# Altium PCB eZlo_Radar.PcbDoc
Units mil, origin at the board's own origin, x right, y up, seen from the top; angles counter-clockwise.
Board outline 1338.58 x 452.76 mil, 4 copper layers (Top Layer, Power, GND, Bottom Layer), stack 64.008 mil thick; 29 components, 19 nets, 114 pads, 52 vias.
Unrouted connection lines stored in the file: 7.
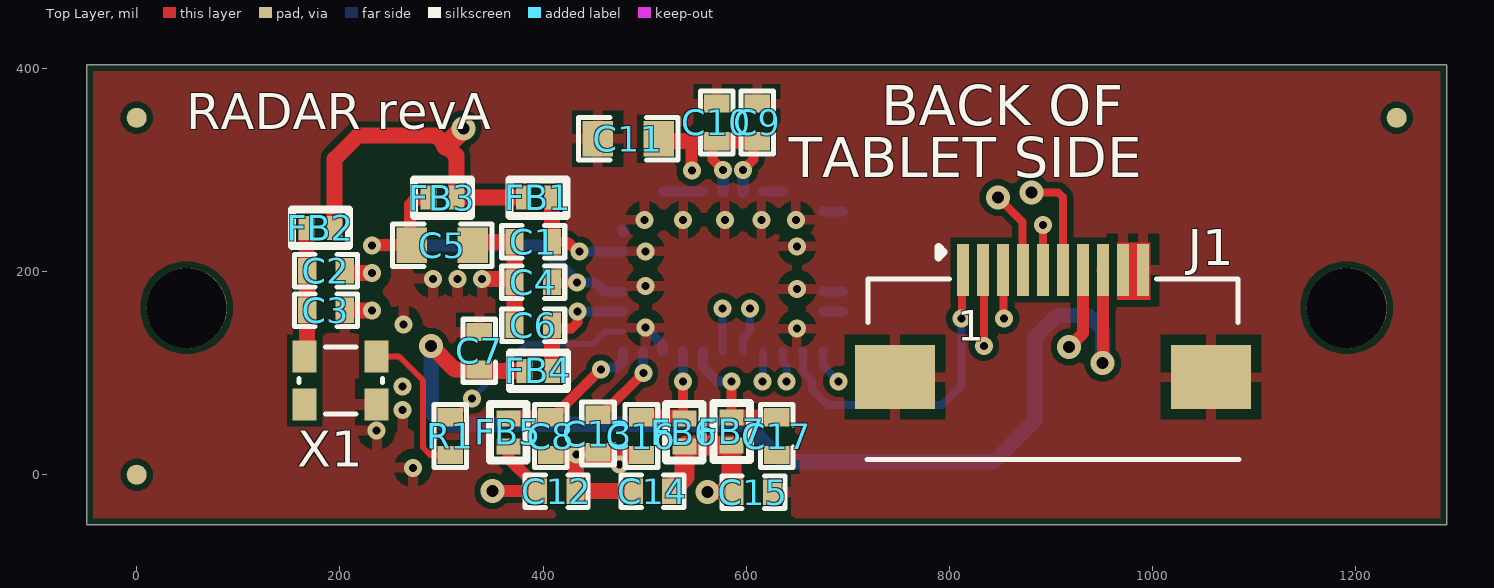
[diagram p0: Top Layer view]
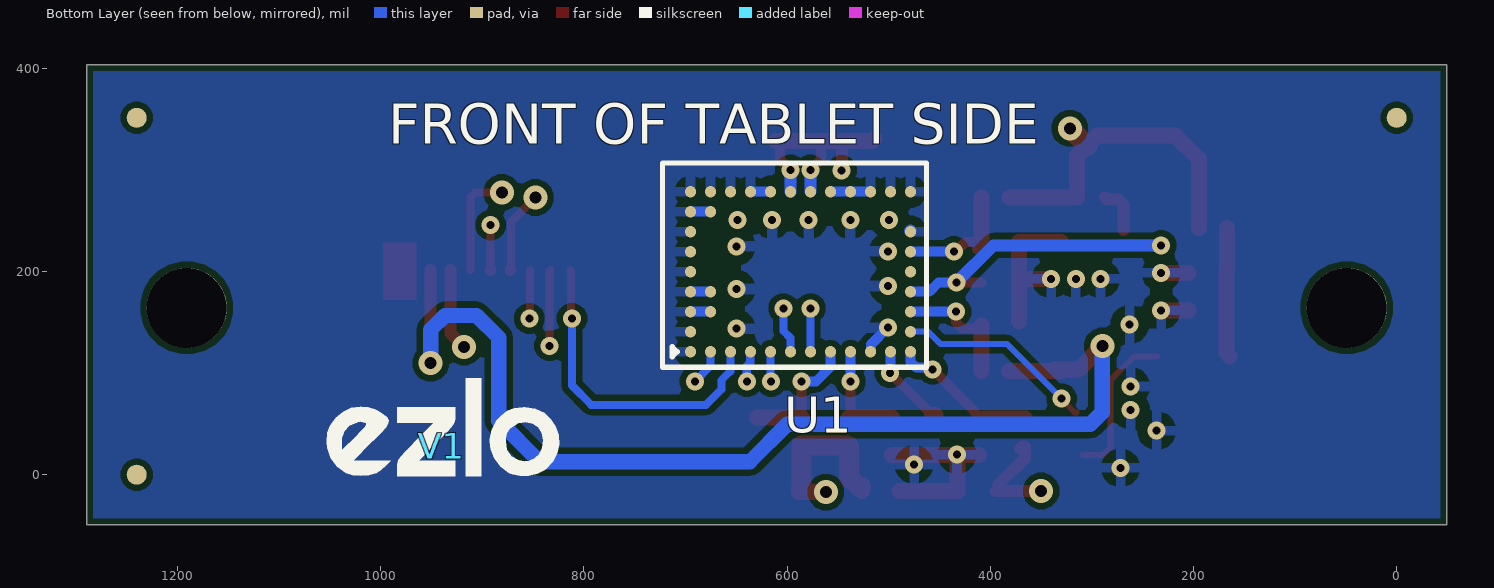
[diagram p1: Bottom Layer view, seen from below]
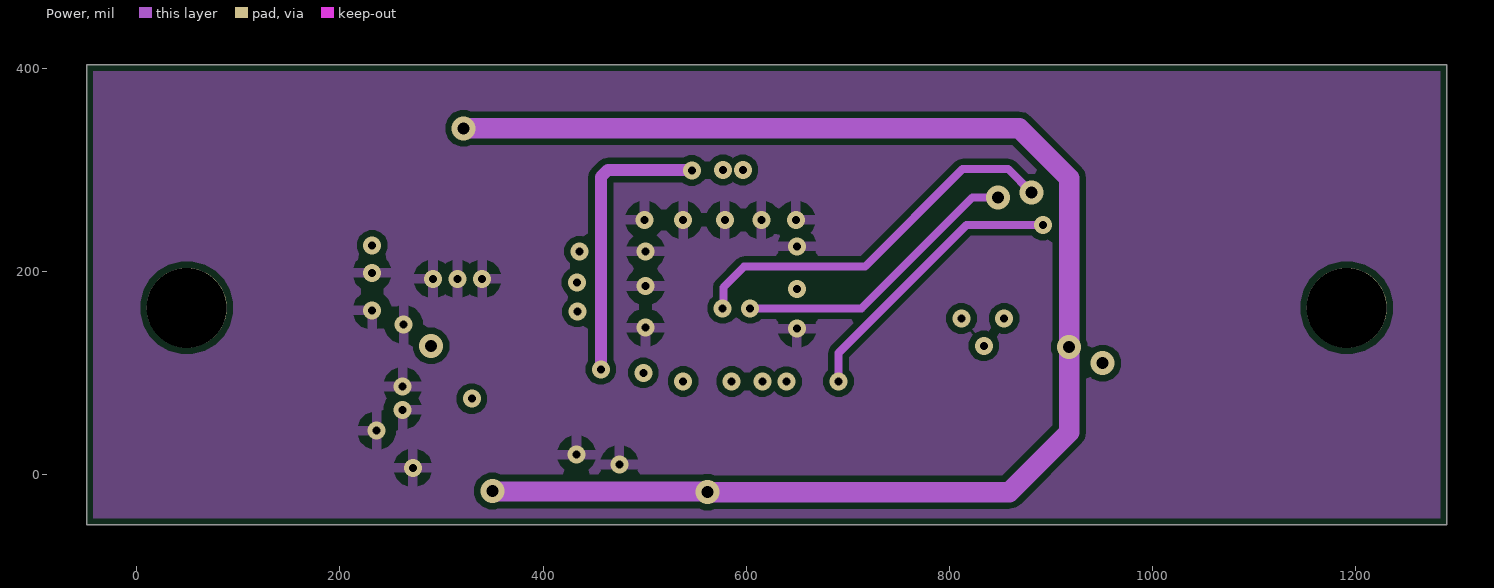
[diagram p2: Power]
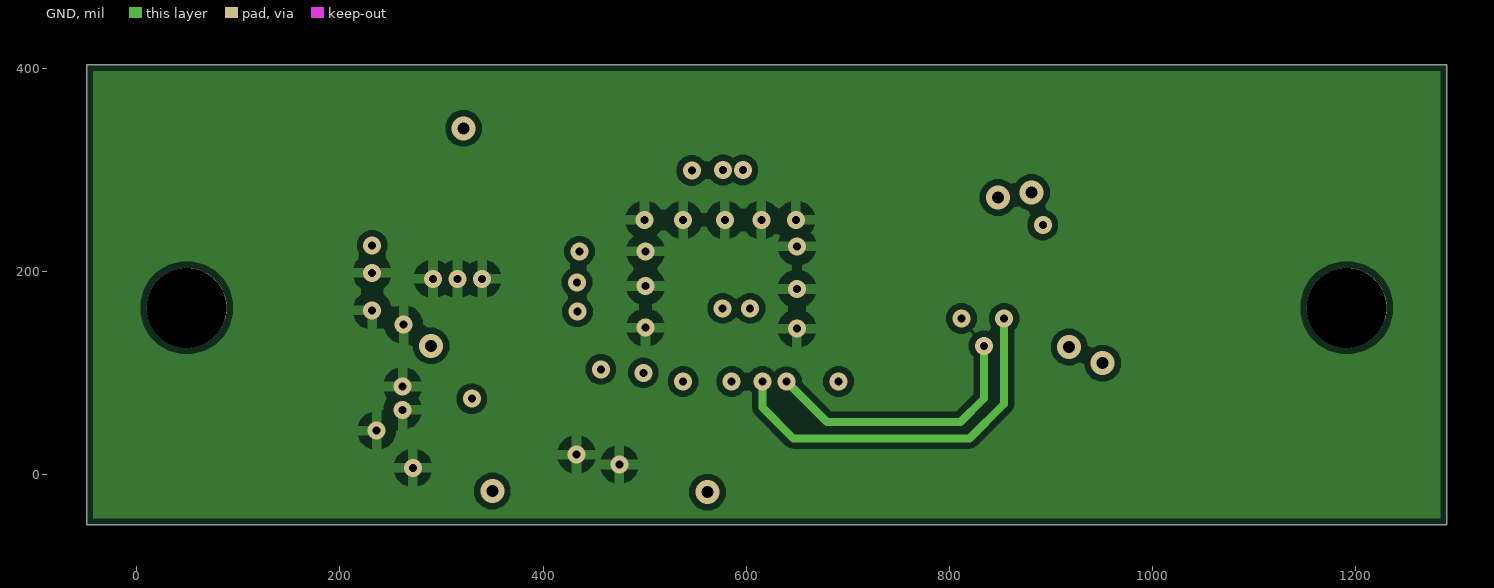
[diagram p3: GND]
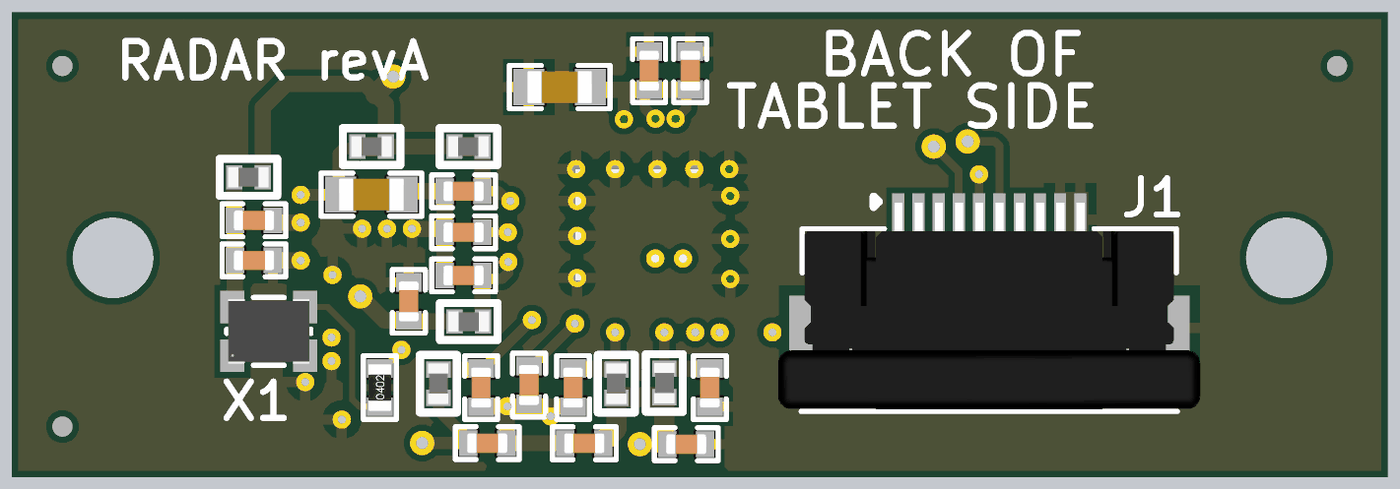
[diagram p4: 3D render of the assembled board from above, using the file's embedded part models]

## Layer stack, top to bottom
Top Solder: solder mask 0.3937, Solder Resist, Dk 3.5
Top Layer: signal copper 1.378
Dielectric 2: prepreg 8.2835, PP-006, Dk 4.1
Power: signal copper 1.378
Dielectric 1: core 41.9291, FR-4, Dk 4.8
GND: signal copper 1.378
Dielectric 3: prepreg 8.2835, PP-006, Dk 4.1
Bottom Layer: signal copper 1.378
Bottom Solder: solder mask 0.3937, Solder Resist, Dk 3.5

## Board outline
-49.21,-49.21 -49.21,403.54 1289.37,403.54 1289.37,-49.21

## Design rules (kind name [scope] priority, off if disabled: settings)
Clearance [All] p1: gap=6 ignorepadtopadclearanceinfootprint=FALSE except(4: Arc-SMDPad Track-SMDPad SMDPad-SMDPad)
ComponentClearance [All] p1: gap=0 collisioncheckmode=3 verticalgap=0 showdistances=FALSE
HoleSize [All] p1: absolutevalues=TRUE maxlimit=1000 minlimit=1 maxpercent=80.000 minpercent=20.000
HoleToHoleClearance [All] p1: gap=0 allowstackedmicrovias=TRUE
MinimumSolderMaskSliver [All] p1: minsoldermaskwidth=0
PlaneConnect [All] p1: planeconnectstyle=Direct reliefexpansion=20 reliefentries=4 reliefconductorwidth=10 reliefairgap=10
PolygonConnect [All] p1: connectstyle=Relief reliefconductorwidth=10 reliefentries=4 polygonreliefangle="90 Angle" airgapwidth=10
RoutingVias [All] p1: holewidth=11.81 width=23.62 viastyle="Through Hole" minholewidth=7.87 minwidth=17.72 maxholewidth=11.81 maxwidth=23.62
SilkToSilkClearance [All] p1: silktosilkclearance=0
SilkToSolderMaskClearance [IsPad] p1: minsilkscreentomaskgap=0 clearancetoexposedcopper=TRUE
SolderMaskExpansion [All] p1: expansion=0 istentingtop=FALSE soldermaskfromhole=TRUE
Width [All] p1: maxlimit=20 minlimit=3.94 preferedwidth=15.75 minimp=50.000000 maximp=50.000000 favimp=50.000000
23 further rules are at their usual default settings.

## Components (designator, comment, footprint, x,y, rotation, side; value= is the part's Value field where it differs from the comment)
C1 "1uF" Cap-0402 390.29,229.29 r180 top
C2 "1uF" Cap-0402 186.28,200.94 r180 top
C3 "10nF" Cap-0402 186.28,161.94 r180 top
C4 "1uF" Cap-0402 390.29,189.29 r180 top
C5 "22uF" Cap-0603 300.61,225.94 r0 top
C6 "1uF" Cap-0402 390.29,147.29 r180 top
C7 "10uF" Cap-0402 337,122 r90 top
C8 "1uF" Cap-0402 407.38,38 r270 top
C9 "1uF" Cap-0402 610.79,346.79 r90 top
C10 "1uF" Cap-0402 570.79,346.79 r90 top
C11 "22uF" Cap-0603 483.79,330.79 r180 top
C12 "10uF" Cap-0402 413.35,-16.14 r0 top
C13 "0.47uF" Cap-0402 454,40.5 r270 top
C14 "10uF" Cap-0402 507.72,-16.27 r180 top
C15 "10uF" Cap-0402 606.94,-17.17 r0 top
C16 "0.1uF" Cap-0402 496.79,38 r270 top
C17 "1uF" Cap-0402 629.89,38 r270 top
FB1 "100MHz" IND-0402 395.01,272.79 r180 top
FB2 "100MHz" IND-0402 180.98,242.91 r180 top
FB3 "100MHz" IND-0402 300.79,272.79 r0 top
FB4 "100MHz" IND-0402 395.29,102.29 r180 top
FB5 "100MHz" IND-0402 365.79,41.79 r270 top
FB6 "100MHz" IND-0402 538.92,41.79 r270 top
FB7 "100MHz" IND-0402 585.62,42.44 r270 top
J1 "AFC01-S10FCC-00" AFC01-S10FCC-00 901.79,148.79 r0 top locked
R1 "150R" Res-0402 308.79,38 r90 top
U1 "BGT60TR13CE6327XUMA1" pg-vf2bga-40 586.79,199.79 r180 bottom locked
V1 "EZLO_LOGO" "Logo Ezlo_S" 940,28 r0 bottom
X1 "80MHz" KC2016K 200.79,92.79 r0 top

## Footprints (in the part's own frame and the unit in brackets; to place one, negate y for a bottom-side part, rotate by r counter-clockwise, add the part's x,y. Pads: shape width x height; smd on the part's side, far side on the other; paste and mask are expansions set on the pad)
AFC01-S10FCC-00 [mm]
  rect 0.3x1.3 smd: 1(-2.25,1.34) 2(-1.75,1.34) 3(-1.25,1.34) 4(-0.75,1.34) 5(-0.25,1.34) 6(0.25,1.34) 7(0.75,1.34) 8(1.25,1.34) 9(1.75,1.34) 10(2.25,1.34)
  rect 2x1.6 smd: MP1(-3.95,-1.34) MP2(3.95,-1.34)
  silkscreen extent -4.65,-3.4 4.65,1.91, body extent -5.22,-3.35 5.22,1.76, height 2.05
Cap-0402 [mil]
  rect 18x25 smd mask+2.36: 1(-18.5,0) 2(18.5,0)
  silkscreen extent -31,-16 31,16, body extent -20,-10 20,10, height 19
Cap-0603 [mil]
  rect 30x35 smd mask+2.36: 1(-30,0) 2(30,0)
  silkscreen extent -49,-21 49,21, body extent -32,-16 31,16, height 34
IND-0402 [mm]
  rect 0.4x0.6 smd: 1(-0.35,0) 2(0.35,0)
  silkscreen extent -0.71,-0.46 0.71,0.46, body extent -0.5,-0.25 0.5,0.25, height 0.25
KC2016K [mm]
  rect 0.6x0.8 smd: 1(-0.9,-0.6) 2(0.9,-0.6) 3(0.9,0.6) 4(-0.9,0.6)
  silkscreen extent -1.04,-0.84 1.04,0.84, body extent -1,-0.8 1,0.8, height 0.81
"Logo Ezlo_S" [mil]
  silkscreen extent -116,-67 113,29
pg-vf2bga-40 [mm]
  round 0.285 smd: A1(-2.75,-2) A2(-2.75,-1.5) A3(-2.75,-1) A4(-2.75,-0.5) A5(-2.75,0) A6(-2.75,0.5) A7(-2.75,1) A8(-2.75,1.5) A9(-2.75,2) B1(-2.25,-2) B3(-2.25,-1) B4(-2.25,-0.5) B8(-2.25,1.5) B9(-2.25,2) C1(-1.75,-2) C9(-1.75,2) D1(-1.25,-2) D9(-1.25,2) E1(-0.75,-2) E9(-0.75,2) F1(-0.25,-2) F9(-0.25,2) G1(0.25,-2) G9(0.25,2) H1(0.75,-2) H9(0.75,2) J1(1.25,-2) J9(1.25,2) K1(1.75,-2) K9(1.75,2) L1(2.25,-2) L9(2.25,2) M1(2.75,-2) M2(2.75,-1.5) M3(2.75,-1) M4(2.75,-0.5) M5(2.75,0) M6(2.75,0.5) M7(2.75,1) M9(2.75,2)
  silkscreen extent -3.45,-2.39 3.15,2.72, body extent -3.4,-2.32 3.1,2.68, height 0.9
Res-0402 [mil]
  rect 18x25 smd mask+2.17: 1(-18.5,0) 2(18.5,0)
  silkscreen extent -32,-17 32,16, body extent -23,-11 23,11, height 16

## Part data
C1 C2 C4 C6 C8 C9 C10 C17: library part CC0402KRX5R6BB105, "CAP CER 1UF 10V X5R 0402", Case Code (Imperial)=0402, Case Code (Metric)=1005, Dielectric=X5R, LCSC Part Number=C106254, Manufacturer=Yageo, Max Operating Temperature=85°C, Min Operating Temperature=-55°C, Package Quantity=1, Resistor Type=Ceramic, Supplier Part Number 1=603-CC402KRX5R6BB105, Tolerance=10%, Voltage Rating=10V, Capacitance=1uF, Case/Package=0402, Category="Ceramic Capacitors", ComponentLink1Description=https://datasheet.ciiva.com/176/upy-gphc-x5r-4v-to-50v-12-176704.pdf?src-supplier=Digi-Key, ComponentLink1URL=https://datasheet.ciiva.com/176/upy-gphc-x5r-4v-to-50v-12-176704.pdf?src-supplier=Digi-Key, ComponentLink2Description=https://datasheet.ciiva.com/176/mlccorderingcode-176705.pdf?src-supplier=Digi-Key, ComponentLink2URL=https://datasheet.ciiva.com/176/mlccorderingcode-176705.pdf?src-supplier=Digi-Key, ComponentLink3Description=https://datasheet.ciiva.com/176/mlccorderingcode-176706.pdf?src-supplier=Digi-Key, ComponentLink3URL=https://datasheet.ciiva.com/176/mlccorderingcode-176706.pdf?src-supplier=Digi-Key, Construction=Flat, Depth=0.5mm, Dissipation Factor=15%, Halogen Free="Halogen Free", Height=0.5mm, Lead Free="Lead Free", Length=1mm, Manufacturer Part Number=CC0402KRX5R6BB105, Mount="Surface Mount", Number of Pins=2, Packaging="Tape and Reel", Pricing 1="1=0.11000, 10=0.05500, 50=0.05500, 100=0.03300, 500=0.02700, 1000=0.02200, 2500=0.02100, 10000=0.01800 (USD)", Radiation Hardening=No, REACH SVHC="No SVHC", RoHS=Yes, RoHS Compliant=Yes, Series=CC, Stock 1=6711367, Supplier 1=Mouser, Termination=SMD/SMT, Thickness=0.022inch, Voltage Rating (DC)=10V, Width=0.02inch
C3: library part CC0402KRX7R8BB103, "CAP CER 10000PF 25V X7R 0402", Case Code (Imperial)=0402, Case Code (Metric)=1005, Dielectric=X7R, LCSC Part Number=C327025, Manufacturer=Yageo, Max Operating Temperature=125°C, Min Operating Temperature=-55°C, Package Quantity=1, Supplier Part Number 1=311-1337-1-ND, Tolerance=10%, Voltage Rating=25V, Capacitance=10nF, Case/Package=0402, ComponentLink1Description=http://www.yageo.com/documents/recent/UPY-GPHC_X7R_6.3V-to-50V_18.pdf?src-supplier=Digi-Key, ComponentLink1URL=http://www.yageo.com/documents/recent/UPY-GPHC_X7R_6.3V-to-50V_18.pdf?src-supplier=Digi-Key, ComponentLink2Description=https://www.verical.com/server-webapp/html/getDatasheet?partID=375418&src-supplier=Verical, ComponentLink2URL=https://www.verical.com/server-webapp/html/getDatasheet?partID=375418&src-supplier=Verical, ComponentLink3Description=http://www.yageo.com/documents/recent/UPY-GPHC_X7R_6.3V-to-50V_8.pdf?src-supplier=Avnet, ComponentLink3URL=http://www.yageo.com/documents/recent/UPY-GPHC_X7R_6.3V-to-50V_8.pdf?src-supplier=Avnet, ComponentLink4Description=https://4donline.ihs.com/images/VipMasterIC/IC/YAGO/YAGO-S-A0003557223/YAGO-S-A0003557223-1.pdf?hkey=52A5661711E402568146F3353EA87419&src-supplier=Element14, ComponentLink4URL=https://4donline.ihs.com/images/VipMasterIC/IC/YAGO/YAGO-S-A0003557223/YAGO-S-A0003557223-1.pdf?hkey=52A5661711E402568146F3353EA87419&src-supplier=Element14, ComponentLink5Description=http://www.farnell.com/datasheets/2167236.pdf?src-supplier=Element14, ComponentLink5URL=http://www.farnell.com/datasheets/2167236.pdf?src-supplier=Element14, ComponentLink6Description=http://www.mouser.com/ds/2/447/Yageo_UPY-GP_NP0_16V-to-50V_9-358835.pdf?src-supplier=Mouser, ComponentLink6URL=http://www.mouser.com/ds/2/447/Yageo_UPY-GP_NP0_16V-to-50V_9-358835.pdf?src-supplier=Mouser, Composition=Ceramic, Depth=0.5mm, Halogen Free="Halogen Free", Height=0.5mm, Lead Free="Lead Free", Length=1mm, Manufacturer Part Number=CC0402KRX7R8BB103, Mount="Surface Mount", Packaging="Tape and Reel", Pricing 1="1=0.1, 10=0.021, 100=0.0093, 500=0.00666, 1000=0.00523, 2500=0.00476, 5000=0.00438 (USD)", Radiation Hardening=No, REACH SVHC=Unknown, Stock 1=0, Supplier 1=Digi-Key, Termination=SMD/SMT, Thickness=0.022inch, Voltage Rating (DC)=25V, Width=0.02inch
C5 C11: library part CC0603MRX5R6BB226, "CAP CER 22UF 10V X5R 0603", Case Code (Imperial)=0603, Case Code (Metric)=1608, Dielectric=X5R, LCSC Part Number=C109447, Manufacturer=Yageo, Max Operating Temperature=85°C, Min Operating Temperature=-55°C, Package Quantity=4000, Supplier Part Number 1=311-1819-1-ND, Tolerance=20%, Voltage Rating=10V, Capacitance=22uF, Case/Package=0603, Category="Ceramic Capacitors", ComponentLink1Description=http://www.mouser.com/ds/2/447/Yageo_UPY-GP_NP0_16V-to-50V_9-358835.pdf?src-supplier=Mouser, ComponentLink1URL=http://www.mouser.com/ds/2/447/Yageo_UPY-GP_NP0_16V-to-50V_9-358835.pdf?src-supplier=Mouser, ComponentLink2Description=http://www.yageo.com/documents/recent/UPY-GPHC_X5R_4V-to-50V_25.pdf?src-supplier=Digi-Key, ComponentLink2URL=http://www.yageo.com/documents/recent/UPY-GPHC_X5R_4V-to-50V_25.pdf?src-supplier=Digi-Key, Halogen Free="Halogen Free", Height=0.8mm, Lead Free="Lead Free", Length=0.063inch, Manufacturer Part Number=CC0603MRX5R6BB226, Mount="Surface Mount", Packaging="Tape and Reel", Pricing 1="1=0.68000, 10=0.48000, 50=0.36300, 100=0.31610, 500=0.23416, 1000=0.19903 (USD)", RoHS=Yes, RoHS Compliant=Yes, Stock 1=19628, Supplier 1=Digi-Key, Termination=SMD/SMT, Thickness=0.035inch, Voltage Rating (DC)=10V, Weight=7.1E-05oz, Width=0.8mm
C7 C12 C14 C15: library part CL05A106MP5NUNC, "CAP CER 10UF 10V X5R 0402", Case Code (Imperial)=0402, Case Code (Metric)=1005, Dielectric=X5R, LCSC Part Number=C315248, Manufacturer=Samsung, Max Operating Temperature=85°C, Min Operating Temperature=-55°C, Package Quantity=1, Tolerance=20%, Voltage Rating=10V, Capacitance=10uF, Case/Package=0402, Category="Ceramic Capacitors", ComponentLink1Description=https://datasheet.ciiva.com/25721/cl05a106mp5nunc-25721584.pdf?src-supplier=Digi-Key, ComponentLink1URL=https://datasheet.ciiva.com/25721/cl05a106mp5nunc-25721584.pdf?src-supplier=Digi-Key, ComponentLink2Description=https://datasheet.ciiva.com/26838/getdatasheetpartid-745310-26838170.pdf?src-supplier=Verical, ComponentLink2URL=https://datasheet.ciiva.com/26838/getdatasheetpartid-745310-26838170.pdf?src-supplier=Verical, Construction=Flat, Contact Plating=Tin, Depth=0.5mm, Item Type=Capacitor, Lead Free="Lead Free", Length=1mm, Manufacturer Part Number=CL05A106MP5NUNC, Mount="Surface Mount", Packaging="Tape and Reel", Pricing 1="10000=0.02537 (USD)", Radiation Hardening=No, RoHS=Yes, RoHS Compliant=Yes, Series=CL, Stock 1=1729850, Supplier 1=Avnet, Supplier Part Number 1=CL05A106MP5NUNC, Termination=Wraparound, Thickness=0.028inch, Width=0.02inch
C13: library part UMK105ABJ474KV-F, "CAP CER 0.47UF 50V X5R 0402", Capacitance=470nF, Case Code (Imperial)=0402, Case Code (Metric)=1005, Dielectric=X5R, LCSC Part Number=C386109, Manufacturer="Taiyo Yuden", Max Operating Temperature=85°C, Min Operating Temperature=-55°C, Package Quantity=10000, Supplier Part Number 1=587-3497-1-ND, Tolerance=10%, Voltage Rating=50V, Case/Package=0402, Category="Ceramic Capacitors", ComponentLink1Description=https://datasheet.ciiva.com/30249/584umk105abj474kv-f-30249824.pdf?src-supplier=Onlinecomponents.com, ComponentLink1URL=https://datasheet.ciiva.com/30249/584umk105abj474kv-f-30249824.pdf?src-supplier=Onlinecomponents.com, ComponentLink2Description=https://datasheet.ciiva.com/24370/10umk105abj474kv-f-24370678.pdf?src-supplier=Onlinecomponents.com, ComponentLink2URL=https://datasheet.ciiva.com/24370/10umk105abj474kv-f-24370678.pdf?src-supplier=Onlinecomponents.com, ComponentLink3Description=https://datasheet.ciiva.com/18697/mlcc-all-e-18697429.pdf?src-supplier=Digi-Key, ComponentLink3URL=https://datasheet.ciiva.com/18697/mlcc-all-e-18697429.pdf?src-supplier=Digi-Key, ComponentLink4Description=https://datasheet.ciiva.com/18697/mlcc-all-e-18697430.pdf?src-supplier=Digi-Key, ComponentLink4URL=https://datasheet.ciiva.com/18697/mlcc-all-e-18697430.pdf?src-supplier=Digi-Key, ComponentLink5Description=https://datasheet.ciiva.com/18697/mlcc-all-e-18697431.pdf?src-supplier=Digi-Key, ComponentLink5URL=https://datasheet.ciiva.com/18697/mlcc-all-e-18697431.pdf?src-supplier=Digi-Key, Height=0.5mm, Item Type=Capacitor, Lead Free="Lead Free", Length=0.039inch, Manufacturer Part Number=UMK105ABJ474KV-F, Mount="Surface Mount", Packaging="Tape and Reel", Pricing 1="1=0.24000, 10=0.16100, 50=0.09680, 100=0.08170, 500=0.05592, 1000=0.04946, 2500=0.04731, 5000=0.04301 (USD)", RoHS=Yes, RoHS Compliant=Yes, Stock 1=145003, Supplier 1=Digi-Key, Termination=SMD/SMT, Thickness=0.022inch, Voltage Rating (DC)=50V, Width=0.02inch
C16: library part CL05B104KB54PNC, "CAP CER 0.1UF 50V X7R 0402", LCSC Part Number=C307331, Manufacturer=Samsung, Supplier Part Number 1=1276-CL05B104KB54PNCDKR-ND, Manufacturer Part Number=CL05B104KB54PNC, Pricing 1="1=0.1, 10=0.067, 50=0.0366, 100=0.0299, 500=0.02138, 1000=0.01681, 2500=0.01528, 5000=0.01406 (USD)", Stock 1=8594, Supplier 1=Digi-Key
FB1 FB2 FB3 FB4 FB5 FB6 FB7: library part BLM15PD121SN1D, "FERRITE BEAD 120 OHM 0402 1LN", Case Code (Imperial)=0402, Case Code (Metric)=1005, Current Rating=1.3A, DC Resistance (DCR)=90mR, LCSC Part Number=C76891, Manufacturer=Murata, Max Operating Temperature=125°C, Min Operating Temperature=-55°C, Package Quantity=1, Tolerance=25%, Case/Package=0402, Category="Ferrite Beads and Chips", ComponentLink1Description=https://datasheet.ciiva.com/11800/0900766b811b5866-11800860.pdf?src-supplier=RSComponents, ComponentLink1URL=https://datasheet.ciiva.com/11800/0900766b811b5866-11800860.pdf?src-supplier=RSComponents, ComponentLink2Description=https://datasheet.ciiva.com/18093/getdatasheetpartid-195858-18093157.pdf?src-supplier=Verical, ComponentLink2URL=https://datasheet.ciiva.com/18093/getdatasheetpartid-195858-18093157.pdf?src-supplier=Verical, ComponentLink3Description=https://datasheet.ciiva.com/41425/001171686-da-01-en-chip-drossel0402-120r-1300ma-1-0x0-5mm-41425776.pdf?src-supplier=Conrad, ComponentLink3URL=https://datasheet.ciiva.com/41425/001171686-da-01-en-chip-drossel0402-120r-1300ma-1-0x0-5mm-41425776.pdf?src-supplier=Conrad, ComponentLink4Description=https://datasheet.ciiva.com/41449/001172205-da-01-en-drossel-0402-120r-11-0x0-5mm-10000st-41449495.pdf?src-supplier=Conrad, ComponentLink4URL=https://datasheet.ciiva.com/41449/001172205-da-01-en-drossel-0402-120r-11-0x0-5mm-10000st-41449495.pdf?src-supplier=Conrad, ComponentLink5Description=https://datasheet.ciiva.com/1012/l0110e-1012435.pdf?src-supplier=Digi-Key, ComponentLink5URL=https://datasheet.ciiva.com/1012/l0110e-1012435.pdf?src-supplier=Digi-Key, ComponentLink6Description=https://datasheet.ciiva.com/1012/l0110e-1012434.pdf?src-supplier=Digi-Key, ComponentLink6URL=https://datasheet.ciiva.com/1012/l0110e-1012434.pdf?src-supplier=Digi-Key, ComponentLink7Description=https://datasheet.ciiva.com/1012/l0110e-1012436.pdf?src-supplier=Digi-Key, ComponentLink7URL=https://datasheet.ciiva.com/1012/l0110e-1012436.pdf?src-supplier=Digi-Key, Core Material=Ferrite, DC Current=1.3A, DC Resistance-Max=90mR, Depth=0.55mm, Height=0.5mm, Impedance=120R, Item Type="Ferrite Bead", Lead Free="Lead Free", Length=1mm, Manufacturer Part Number=BLM15PD121SN1D, Material=Steel,Ferrite, Max Current Rating=1.3A, Max DC Current=1.3A, Military Standard=Not, Number of Circuits=1, Number of Lines=1, Number of Pins=2, Packaging="Tape and Reel", Pricing 1="10000=0.03238, 20000=0.03063, 40000=0.02888, 60000=0.02713, 80000=0.02538, 100000=0.02363, 1000000=0.02188 (USD)", Radiation Hardening=No, Reach SVHC Compliant=Yes, RoHS=Yes, RoHS Compliant=Yes, Series=BLM15PD, Stock 1=300000, Supplier 1=Avnet, Supplier Part Number 1=BLM15PD121SN1D, Termination=SMD/SMT, Test Frequency=100MHz, Width=0.5mm
J1: "Clamshell 10 Bottom Contact Surface Mount 0.5mm SMD,P=0.5mm FFC/FPC Connectors ROHS", LCSC Part Number=C262266, Manufacturer=JUSHUO, Package=SMD,P=0.5mm, ComponentLink1Description=LCSC, ComponentLink1URL=https://www.lcsc.com/product-detail/FFC-FPC-Connectors_JUSHUO-AFC01-S10FCC-00_C262266.html, Item Type="FPC Connector", Manufacturer Part Number=AFC01-S10FCC-00
R1: library part ERJ-2GEJ151X, "RES SMD 150 OHM 5% 1/10W 0402", Case Code (Imperial)=0402, Case Code (Metric)=1005, LCSC Part Number=C412976, Manufacturer=Panasonic, Max Operating Temperature=155°C, Max Power Dissipation=100mW, Min Operating Temperature=-55°C, Package Quantity=10000, Ratings=AEC-Q200, Resistance Tolerance=5%, Resistor Type="Thick Film", Supplier Part Number 1=65T8254, Temperature Coefficient=200ppm/°C, Voltage Rating=50V, Case/Package=0402, Category="Chip SMD Resistors", ComponentLink1Description=https://datasheet.ciiva.com/11821/0900766b80f806dd-11821182.pdf?src-supplier=RSComponents, ComponentLink1URL=https://datasheet.ciiva.com/11821/0900766b80f806dd-11821182.pdf?src-supplier=RSComponents, ComponentLink2Description=https://datasheet.ciiva.com/43460/1500035-43460367.pdf?src-supplier=Farnell, ComponentLink2URL=https://datasheet.ciiva.com/43460/1500035-43460367.pdf?src-supplier=Farnell, ComponentLink3Description=https://datasheet.ciiva.com/6082/1500035-6082105.pdf?src-supplier=Farnell, ComponentLink3URL=https://datasheet.ciiva.com/6082/1500035-6082105.pdf?src-supplier=Farnell, ComponentLink4Description=https://datasheet.ciiva.com/46377/1500035-46377070.pdf?src-supplier=Element14, ComponentLink4URL=https://datasheet.ciiva.com/46377/1500035-46377070.pdf?src-supplier=Element14, ComponentLink5Description=https://datasheet.ciiva.com/28568/1678796-28568939.pdf?src-supplier=Element14, ComponentLink5URL=https://datasheet.ciiva.com/28568/1678796-28568939.pdf?src-supplier=Element14, ComponentLink6Description=https://datasheet.ciiva.com/16773/70260739-16773454.pdf?src-supplier=Allied+Electronics, ComponentLink6URL=https://datasheet.ciiva.com/16773/70260739-16773454.pdf?src-supplier=Allied+Electronics, ComponentLink7Description=https://datasheet.ciiva.com/30178/4aoa0000ce1-30178453.pdf?src-supplier=Onlinecomponents.com, ComponentLink7URL=https://datasheet.ciiva.com/30178/4aoa0000ce1-30178453.pdf?src-supplier=Onlinecomponents.com, Construction=Rectangular, Contact Plating=Tin, Depth=0.5mm, Features="Automotive AEC-Q200", Height=0.35mm, Item Type=Resistor, Lead Free="Lead Free", Length=1mm, Manufacturer Part Number=ERJ-2GEJ151X, Military Standard=Not, Mount="Surface Mount", Number of Terminations=2, Packaging="Tape and Reel", Power Rating=100mW, Pricing 1="1=0.10100, 25=0.03200, 100=0.01300, 250=0.01100, 500=0.00900, 1000=0.00500 (USD)", Radiation Hardening=No, Reach SVHC Compliant=Yes, Resistance=150R, RoHS=Yes, RoHS Compliant=Yes, Series=ERJ, Stock 1=19191, Supplier 1=Avnet, Technology="THICK FILM", Termination=SMD/SMT, Tolerance=5%, Voltage Rating (DC)=50V, Weight=2.8E-05oz, Width=0.5mm, Working Voltage=50V
U1: "Rf Transceiver PG-VF2BGA-40", LCSC Part Number=C3606641, Manufacturer=Infineon, Supplier Part Number 1=25AK0242, Category="RF Receivers, Transceivers", ComponentLink1Description=LCSC, ComponentLink1URL=https://www.lcsc.com/product-detail/RF-Transceiver-ICs_Infineon-Technologies-BGT60TR13CE6327XUMA1_C3606641.html, Item Type=IC, Manufacturer Part Number=BGT60TR13CE6327XUMA1, Pricing 1="1=20.67000, 10=18.89000, 25=17.50000, 50=16.72000, 100=15.93000, 250=15.16000, 500=14.94000, 1000=14.51000 (USD)", RoHS=No, Stock 1=4397, Supplier 1=Newark
V1: library part "Logo Ezlo_S", Sheetfile=radar.kicad_sch
X1: library part KC2016K80.0000C1GE00, "XTAL OSC XO 80.0000MHZ CMOS SMD", Case/Package=SMD/SMT, Frequency Stability=50ppm, LCSC Part Number=C1988243, Manufacturer="Kyocera AVX", Max Operating Temperature=85°C, Max Supply Current=8mA, Min Operating Temperature=-40°C, Supplier Part Number 1=478-KC2016K80.0000C1GE00CT-ND, Category=Oscillators, ComponentLink1Description=http://www.mouser.com/ds/2/40/clock_k_e-522534.pdf?src-supplier=Mouser, ComponentLink1URL=http://www.mouser.com/ds/2/40/clock_k_e-522534.pdf?src-supplier=Mouser, ComponentLink2Description=http://www.kyocera-crystal.jp/eng/wp-content/uploads/2014/09/pkg_e.pdf?src-supplier=Digi-Key, ComponentLink2URL=http://www.kyocera-crystal.jp/eng/wp-content/uploads/2014/09/pkg_e.pdf?src-supplier=Digi-Key, ComponentLink3Description=http://global.kyocera.com/prdct/electro/product/pdf/clock_k_e.pdf?src-supplier=Digi-Key, ComponentLink3URL=http://global.kyocera.com/prdct/electro/product/pdf/clock_k_e.pdf?src-supplier=Digi-Key, Frequency=80MHz, Height=0.031inch, Item Type=Crystal, Lead Free="Lead Free", Length=0.079inch, Manufacturer Part Number=KC2016K80.0000C1GE00, Mount="Surface Mount", Packaging="Tape and Reel", Pricing 1="1=1.31000, 10=1.25300, 50=1.22440, 100=1.04940, 500=1.02024, 1000=0.85992 (USD)", RoHS=Yes, RoHS Compliant=No, Stock 1=350, Supplier 1=Digi-Key, Width=0.063inch

## Free pads (board coordinates)
  round 78.74 hole 78.74 unplated: MH(49.21,164.32) MH(1190.94,164.32)
  round 19.68 smd: ""(0,0) ""(0,351.33) ""(1240.16,351.33)
  round 19.68 smd far side: ""(0,351.33) ""(1240.16,0) ""(1240.16,351.33)

## Via types
v1: diameter 17.72, hole 7.87, Top Layer to Bottom Layer, 44 vias
v2: diameter 23.62, hole 11.81, Top Layer to Bottom Layer, 8 vias

## Nets (pads, with @x,y where several pads share a name; then routed paths per layer and width w, separated by ;. In a path a pad name is that pad's centre, name@x,y a point inside that pad or via, vN(x,y) a via of type N, cw(c..) or ccw(c..) an arc to the next point about the centre after c; other vN are vias at no path point)
1V8_SENSOR: C12.1 C14.1 C15.1 FB1.2 FB2.1 FB3.2 FB5.2 FB6.2 FB7.2 J1.7 | length 2154.2
  Top Layer w11.81: v2(350,-16) 350.07,-16.07 394.78,-16.07 C12.1 ; FB5.2@370.55,26.04 368.59,28.01 FB5.2 365.79,16.42 391.76,-9.55 391.76,-13.05 C12.1@394.39,-15.68 ; v2(917.79,125.79) 931.31,139.31 J1.7
  Top Layer w15.75: FB2.1 194.75,310.75 217.79,333.79 294.79,333.79 304.68,323.9 314.57,314.01 FB3.2 FB1.2 ; C14.1 526.22,-12.77 C14.1@527.34,-11.64 ; v2(561.83,-17.17) C15.1 588.44,-13.67 C15.1@585.62,-10.85
  Top Layer w19.68: C14.1@527.34,-11.64 529.7,-11.64 538.92,-2.42 FB6.2 ; FB6.2@540.89,28.66 FB7.2 C15.1@585.62,-10.85
  Top Layer w20: 304.68,323.9 v2(321.79,341.01)
  Power w20: v2(321.79,341.01) 868.57,341.01 917.79,291.79 v2(917.79,125.79) 917.79,41.79 858.83,-17.17 v2@560.85,-17.17 ; v2(350,-16) 350.59,-16.59 561.24,-16.59 v2(561.83,-17.17)
3V3_SENSOR: C7.1 FB4.2 J1.8 | length 1092.8
  Top Layer w11.81: v2@950.9,109.9 J1.8@950.9,201.45
  Top Layer w12: v2(950.79,109.79) v2@950.9,109.9 ; J1.8@950.9,201.45 J1.8
  Top Layer w15.75: v2(289.79,126.79) 313.07,103.5 C7.1 ; C7.1@330.29,102.29 349.79,102.29 FB4.2
  Bottom Layer w15: v2(289.79,126.79) 289.79,61.57 301.57,49.79 599.79,49.79 636.79,12.79 843.79,12.79 883.79,52.79 883.79,134.79 905.79,156.79 936.79,156.79 950.79,142.79 v2(950.79,109.79)
BGT_CLK: J1.5 U1.B1 | length 361.5
  Top Layer w7.87: J1.5@891.87,201.62 v1@891.87,245.71
  Top Layer w12: v1(891.79,245.79) v1@891.87,245.71 ; J1.5@891.87,201.62 J1.5
  Power w7.87: v1(690.79,91.79) 690.79,119.79 816.79,245.79 v1(891.79,245.79)
  Bottom Layer w7.87: U1.B1 675.37,107.2 v1(690.79,91.79)
  Bottom Layer w10: U1.B1 U1.B1@675.6,120.81
BGT_CS: J1.6 U1.G1 | length 529
  Top Layer w7.87: v2(880.79,277.79) 907.02,277.79 911.63,273.17 J1.6
  Power w7.87: v1(576.79,163.79) 577.46,164.46 577.46,184.46 597.79,204.79 716.79,204.79 812.79,300.79 857.79,300.79 v2(880.79,277.79)
  Bottom Layer w7.87: U1.G1@576.79,121.2 v1(576.79,163.79)
BGT_IRQ: J1.1 U1.C1 | length 316.5
  Top Layer w7.87: v1(811.79,153.79) 812.5,154.5 812.5,200.83 J1.1
  Bottom Layer w7.87: U1.C1@655.92,120.81 655.92,101.81 664.79,92.94 664.79,83.79 679.79,68.79 792.79,68.79 811.79,87.79 v1(811.79,153.79)
  Bottom Layer w10: U1.C1 U1.C1@655.92,120.81
BGT_MISO: J1.3 U1.E1 | length 451.8
  Top Layer w7.87: J1.3 853.18,200.94 853.18,154.39 v1(853.79,153.79)
  GND w7.87: v1(615.79,91.79) 615.79,66.21 646.21,35.79 819.79,35.79 853.79,69.79 v1(853.79,153.79)
  Bottom Layer w8: v1@616.31,91.79 U1.E1
BGT_MOSI: J1.2 U1.D1 | length 378.5
  Top Layer w7.87: J1.2 833.79,200.64 v1(833.79,126.79)
  GND w7.87: v1(639.5,91.64) 679.36,51.79 810.79,51.79 833.79,74.79 v1(833.79,126.79)
  Bottom Layer w8: U1.D1@636.23,120.81 636.23,110.34 639.79,106.79 639.79,91.93 v1(639.5,91.64)
  Bottom Layer w10: U1.D1 U1.D1@636.23,120.81
BGT_RST: J1.4 U1.F1 | length 416.3
  Top Layer w7.87: v2(847.79,272.79) 871.92,248.65 871.92,202.07 J1.4@872.35,201.64
  Top Layer w12: J1.4 J1.4@872.35,201.64
  Power w7.87: v1(603.79,163.79) 713.41,163.79 822.41,272.79 v2(847.79,272.79)
  Bottom Layer w7.87: U1.F1 596.63,134.48 603.79,141.64 v1(603.79,163.79)
GND: C1.2 C2.1 C3.1 C4.2 C5.2 C6.2 C7.2 C8.2 C9.2 C10.2 C11.2 C12.2 C13.2 C14.2 C15.2 C16.2 C17.2 J1.9 J1.10 J1.MP1 J1.MP2 U1.A1 U1.A2 U1.A3 U1.A4 U1.A5 U1.A6 U1.A7 U1.A8 U1.A9 U1.B3 U1.B4 U1.B8 U1.B9 U1.C9 U1.D9 U1.E9 U1.H9 U1.J9 U1.K1 U1.K9 U1.L9 U1.M7 U1.M9 X1.2 | length 525
  Top Layer w15.75: C3.1 204.86,161.87 v1@231.79,161.87 ; C2.1@204.86,198.79 v1(231.79,198.79) ; v1(315.79,192.79) v1@316.16,192.41 ; C5.2@330.61,229.29 C1.2 ; v1(340.04,192.79) 340.41,192.41 370.66,192.41 C4.2@371.79,191.28 ; C6.2@371.79,150.79 C4.2 C4.2@371.79,191.28 ; C1.2@371.79,219.29 C4.2@371.79,191.28 ; C8.2@411.38,19.5 v1@432.5,19.5 ; v1(432.79,19.79) v1@432.5,19.5 ; C14.2 489.15,-16.21 431.92,-16.21 C12.2 432.41,-15.59 432.41,19.41 v1@432.5,19.5 ; C16.2 v1@432.5,19.5
  Bottom Layer w9.84: v1(500.79,144.79) 517.63,127.95 517.63,121.31 U1.K1 ; U1.K9 U1.J9 U1.H9 ; U1.E9 U1.D9 ; U1.B3 U1.A3 ; U1.B4 U1.A4 ; U1.B8 U1.A8
  Bottom Layer w12: U1.M7@478.52,240.05 U1.M7@478.79,239.79
  other v1: 271.79,6.79 475,10 236.22,43.35 261.79,63.79 261.79,86.79 649.79,143.79 262.79,147.79 231.79,161.79 649.79,182.79 500.79,185.79 291.54,192.79 500.79,219.79 649.79,224.79 499.79,250.79 537.79,250.79 578.79,250.79 614.79,250.79 648.79,250.79
NetR1_1: R1.1 X1.3 | length 152.5
  Top Layer w5.91: X1.3@235.22,116.41 258.37,116.41 281.79,92.99 281.79,26.79 289.07,19.5 R1.1
OSC_80M: R1.2 U1.M2 | length 196.6
  Top Layer w5.91: R1.2@315.29,61.29 317.07,61.29 329.79,74 v1(329.79,74.79)
  Bottom Layer w5.91: v1(329.79,74.79) 383.79,128.79 449.18,128.79 461.13,140.73 U1.M2
VAREF: C13.1 U1.L1 | length 85.4
  Top Layer w9.84: C13.1@457.5,59 v1(498.7,100.29)
  Top Layer w15.75: C13.1 C13.1@457.5,59 ; v1(498.7,100.29) v1(498.7,100.29)
  Bottom Layer w9.84: U1.L1 498.47,120.78 498.47,98.11 v1@498.79,97.79
VCC_OSC: C2.2 C3.2 FB2.2 X1.4 | length 127.3
  Top Layer w15.75: X1.4@164.35,116.41 167.78,119.84 C2.2 ; C2.2@167.2,201.53 FB2.2
VDD_A: C16.1 FB6.1 U1.J1 | length 108.3
  Top Layer w9.84: v1(537.79,91.79) 537.79,56.7 FB6.1
  Top Layer w15.75: C16.1 497.07,56.22 FB6.1@538.92,56.22
  Bottom Layer w9.84: U1.J1 537.68,120.94 537.68,91.89 v1(537.79,91.79)
VDD_D: C17.1 FB7.1 U1.H1 | length 124.6
  Top Layer w9.84: FB7.1 v1@585.62,87.49
  Top Layer w15.75: FB7.1@585.91,56.22 593.48,56.22 593.77,56.5 C17.1
  Bottom Layer w9.84: U1.H1 557.52,120.78 557.52,105.89 571.63,91.79 v1(585.62,91.79)
VDD_LF: C6.1 FB4.1 U1.M3 | length 124.4
  Top Layer w9.84: C6.1@411.79,143.92 427.92,143.92 433.79,149.79 v1(433.79,160.42)
  Top Layer w15.75: FB4.1@408.79,102.29 C6.1@408.79,146.92
  Bottom Layer w9.84: v1(433.79,160.42) U1.M3
VDD_PLL: C4.1 C5.1 FB3.1 U1.M4 | length 375
  Top Layer w9.84: C4.1 v1(433.29,189.29) v1@435.29,189.29
  Top Layer w11.81: v1@231.79,225.87 C5.1@270.61,225.87 ; C5.1@268.79,240.95 268.79,265.87 273.79,270.87 285.1,270.87 FB3.1
  Bottom Layer w9.84: v1@435.29,189.29 450.96,189.29 460.15,180.1 U1.M4
  Bottom Layer w11.81: v1(231.79,225.79) 396.79,225.79 v1(433.29,189.29)
VDD_RF: C8.1 C9.1 C10.1 C11.1 FB5.1 U1.F9 U1.G9 U1.M1 | length 653.5
  Top Layer w9.84: C8.1 410.88,56.5 414.96,60.58 414.96,61.96 v1(456.79,103.79) ; C10.1@567.29,328.29 566.7,327.7 566.7,310.29 v1@575.95,301.04 ; v1(596.63,299.94) 606.97,310.29 606.97,324.47 C9.1
  Top Layer w11.81: v1@545.96,299.77 545.96,324.12
  Top Layer w12: v1@575.95,301.04 v1(577.05,299.94) ; C9.1 C9.1
  Top Layer w15.75: FB5.1 C8.1@406.45,55.57 ; C11.1 516.29,328.29 541.79,328.29 567.29,328.29 C10.1 ; v1@545.96,299.77 v1(546.33,299.4) ; C10.1@576.29,328.29 C9.1
  Power w11.81: v1(456.79,103.79) 456.79,293.03 463.71,299.94 v1@545.79,299.94
  Bottom Layer w9.84: v1(456.79,103.79) 458.29,105.29 472.75,105.29 478.52,111.06 U1.M1
  Bottom Layer w12: U1.G9@577.05,278.63 v1(577.05,299.94) ; U1.F9 v1(596.63,299.94)
VDD_VCO: C1.1 FB1.1 U1.M6 | length 127.8
  Top Layer w9.84: C1.1@412.87,221.71 408.79,225.79 C1.1 424.16,229.29 433.66,219.79 v1(435.79,219.79)
  Top Layer w15.75: C1.1 FB1.1
  Bottom Layer w9.84: v1@434.28,221.29 v1(435.79,219.79) ; v1@437.79,221.79 437.79,221.27 439.42,219.63 478.36,219.63 U1.M6
pads on no net: U1.M5 X1.1

## Polygon pours and split planes (outlines as drawn)
GND on Bottom Layer "GND_L04_P009" (solid, remove dead copper, pour order 9): -43,397 1283,397 1283,-43 -43,-43
GND on Power "GND_L02_P010" (solid, remove dead copper, pour order 10): -43,397 1283,397 1283,-43 -43,-43
GND on GND "GND_L03_P011" (solid, remove dead copper, pour order 11): -43,397 1283,397 1283,-43 -43,-43
GND on Top Layer "GND_L01_P003" (solid, remove dead copper, pour order 3): -43,397 1283,397 1283,-43 -43,-43

## Other copper
Top Layer:
  rectangle net GND: 964.79,171.79 997.79,228.79

## Silkscreen, mask and mechanical layers (free items; w line width, h text height)
Top Overlay:
  text "BACK OF" at 732.79,343.79 h39.37
  text "RADAR revA" at 48.79,339.79 h35.43
  text "TABLET SIDE" at 641.79,292.79 h39.37
Bottom Overlay:
  text "FRONT OF TABLET SIDE" at 992.79,325.79 h39.37
Board Outline:
  the board outline again, w10
Mechanical 3:
  drawing of 835 lines, arcs and shapes, not listed
Fabrication:
  drawing of 400 lines, arcs and shapes, not listed
  text "Layer" at 1915.47,940.46 h60
  text "Name" at 2325.38,940.46 h60
  text "Material" at 3255.12,940.46 h60
  text "Thickness" at 4114.89,940.46 h60
  text "Constant" at 4764.73,940.46 h60
  text "Board Layer Stack" at 5334.59,940.46 h60
  text "Top Overlay" at 2325.38,820.46 h60
  text "Top Solder" at 2325.38,700.46 h60
  text "Solder Resist" at 3255.12,700.46 h60
  text "0.39mil" at 4114.89,700.46 h60
  text "3.5" at 4764.73,700.46 h60
  text "1" at 1915.47,580.46 h60
  text "Top Layer" at 2325.38,580.46 h60
  text "1.38mil" at 4114.89,580.46 h60
  text "Dielectric 2" at 2325.38,460.46 h60
  text "PP-006" at 3255.12,460.46 h60
  text "8.28mil" at 4114.89,460.46 h60
  text "4.1" at 4764.73,460.46 h60
  text "2" at 1915.47,340.46 h60
  text "Power" at 2325.38,340.46 h60
  text "CF-004" at 3255.12,340.46 h60
  text "1.38mil" at 4114.89,340.46 h60
  text "Dielectric 1" at 2325.38,220.46 h60
  text "FR-4" at 3255.12,220.46 h60
  text "41.93mil" at 4114.89,220.46 h60
  text "4.8" at 4764.73,220.46 h60
  text "3" at 1915.47,100.46 h60
  text "GND" at 2325.38,100.46 h60
  text "CF-004" at 3255.12,100.46 h60
  text "1.38mil" at 4114.89,100.46 h60
  text "Dielectric 3" at 2325.38,-19.54 h60
  text "PP-006" at 3255.12,-19.54 h60
  text "8.28mil" at 4114.89,-19.54 h60
  text "4.1" at 4764.73,-19.54 h60
  text "4" at 1915.47,-139.54 h60
  text "Bottom Layer" at 2325.38,-139.54 h60
  text "1.38mil" at 4114.89,-139.54 h60
  text "Bottom Solder" at 2325.38,-259.54 h60
  text "Solder Resist" at 3255.12,-259.54 h60
  text "0.39mil" at 4114.89,-259.54 h60
  text "3.5" at 4764.73,-259.54 h60
  text "Bottom Overlay" at 2325.38,-379.54 h60
Drill Drawing:
  circle w10: c-1207.97,1485.33 r33.33
  lines w10: -1241.3,1368.67 -1174.64,1368.67 -1207.97,1302 -1241.3,1368.67 ; -1241.3,1602 -1174.64,1602 -1174.64,1668.67 -1241.3,1668.67 -1241.3,1602
  lines w15: -1301.09,1257 9180.01,1257 ; -1301.09,1707 9180.01,1707 ; -750.22,1107 -750.22,1857 ; -210.36,1107 -210.36,1857 ; 889.32,1107 889.32,1857 ; 1395.2,1107 1395.2,1857 ; 2129,1107 2129,1857 ; 3628.55,1107 3628.55,1857 ; 4218.4,1107 4218.4,1857 ; 4964.2,1107 4964.2,1857 ; 5614.03,1107 5614.03,1857 ; 6467.79,1107 6467.79,1857 ; 7801.4,1107 7801.4,1857 ; -1301.09,1107 9180.01,1107 9180.01,1857 -1301.09,1857 -1301.09,1107
  text "Symbol" at -1211.09,1752 h72
  text "Count" at -705.22,1752 h72
  text "Hole Size" at -165.36,1752 h72
  text "Plated" at 934.32,1752 h72
  text "Hole Type" at 1440.2,1752 h72
  text "Drill Layer Pair" at 2174,1752 h72
  text "Via/Pad" at 3673.55,1752 h72
  text "Pad Shape" at 4263.4,1752 h72
  text "Template" at 5009.2,1752 h72
  text "Description" at 5659.03,1752 h72
  text "Hole Tolerance (+)" at 6512.79,1752 h72
  text "Hole Tolerance (-)" at 7846.4,1752 h72
  text "2" at -705.22,1602 h60
  text "2.000mm (78.74mil)" at -165.36,1602 h60
  text "NPTH" at 934.32,1602 h60
  text "Round" at 1440.2,1602 h60
  text "Top Layer - Bottom Layer" at 2174,1602 h60
  text "Pad" at 3673.55,1602 h60
  text "Rounded" at 4263.4,1602 h60
  text "c200hn200" at 5009.2,1602 h60
  text "8" at -705.22,1452 h60
  text "0.300mm (11.81mil)" at -165.36,1452 h60
  text "PTH" at 934.32,1452 h60
  text "Round" at 1440.2,1452 h60
  text "Top Layer - Bottom Layer" at 2174,1452 h60
  text "Via" at 3673.55,1452 h60
  text "Rounded" at 4263.4,1452 h60
  text "v60h30" at 5009.2,1452 h60
  text "44" at -705.22,1302 h60
  text "0.200mm (7.87mil)" at -165.36,1302 h60
  text "PTH" at 934.32,1302 h60
  text "Round" at 1440.2,1302 h60
  text "Top Layer - Bottom Layer" at 2174,1302 h60
  text "Via" at 3673.55,1302 h60
  text "Rounded" at 4263.4,1302 h60
  text "v45h20" at 5009.2,1302 h60
  text "54 Total" at -705.22,1152 h60

## Dimensions
-49.21,-49.21 to 1289.37,-49.21 on Dimension
1289.37,403.54 to 1289.37,-49.21 on Dimension

## Text inside footprints (layer, text, board x,y; h text height)
J1: Top Overlay "1" at 807.79,131.79 h30